# Altium PCB HP-85_IO_Extender_V2_4_Layer.PcbDoc
Units mil, origin at the board's own origin, x right, y up, seen from the top; angles counter-clockwise.
Board outline 4900 x 3937.01 mil, 4 copper layers (Top Layer, VCC, GND, Bottom Layer), stack 60.417 mil thick; 45 components, 37 nets, 161 pads, 87 vias.
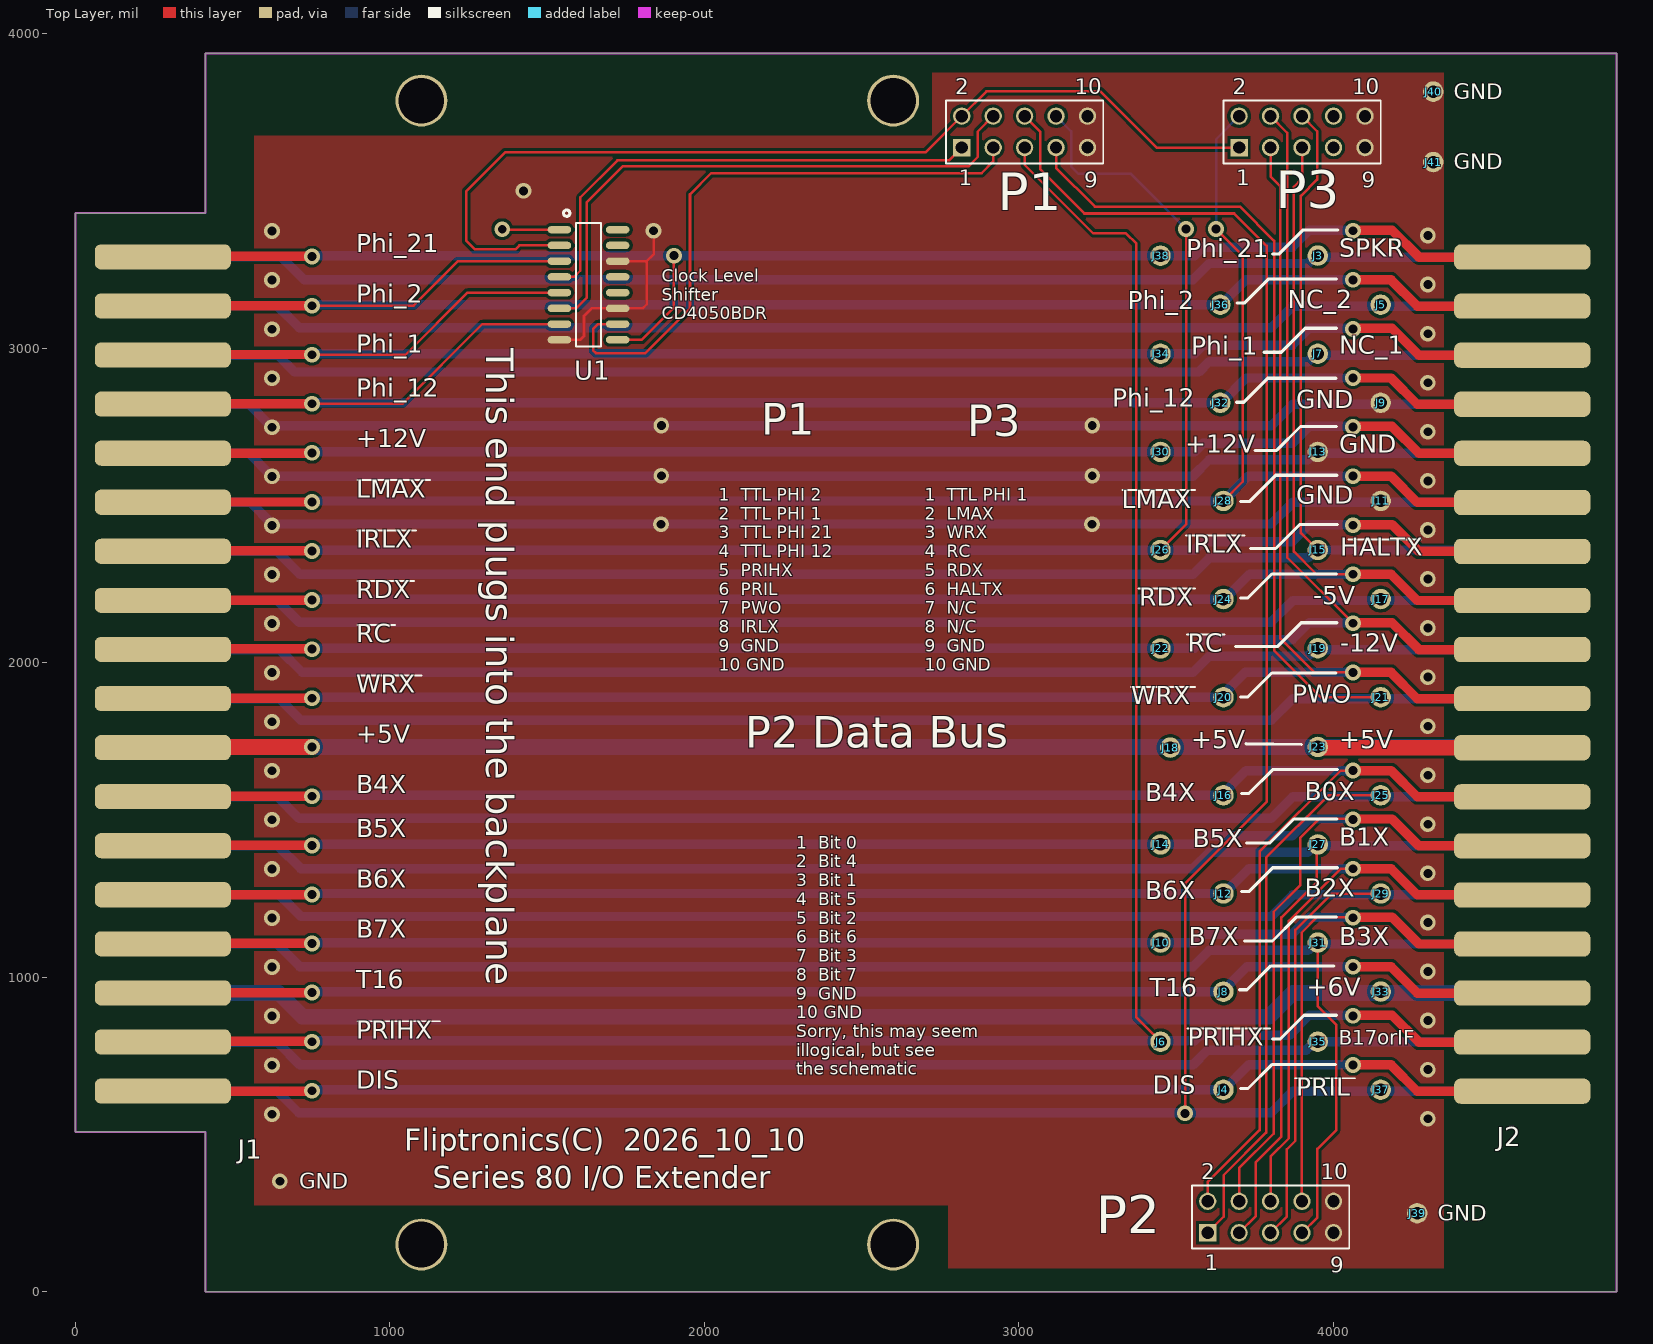
[diagram p0: Top Layer view]
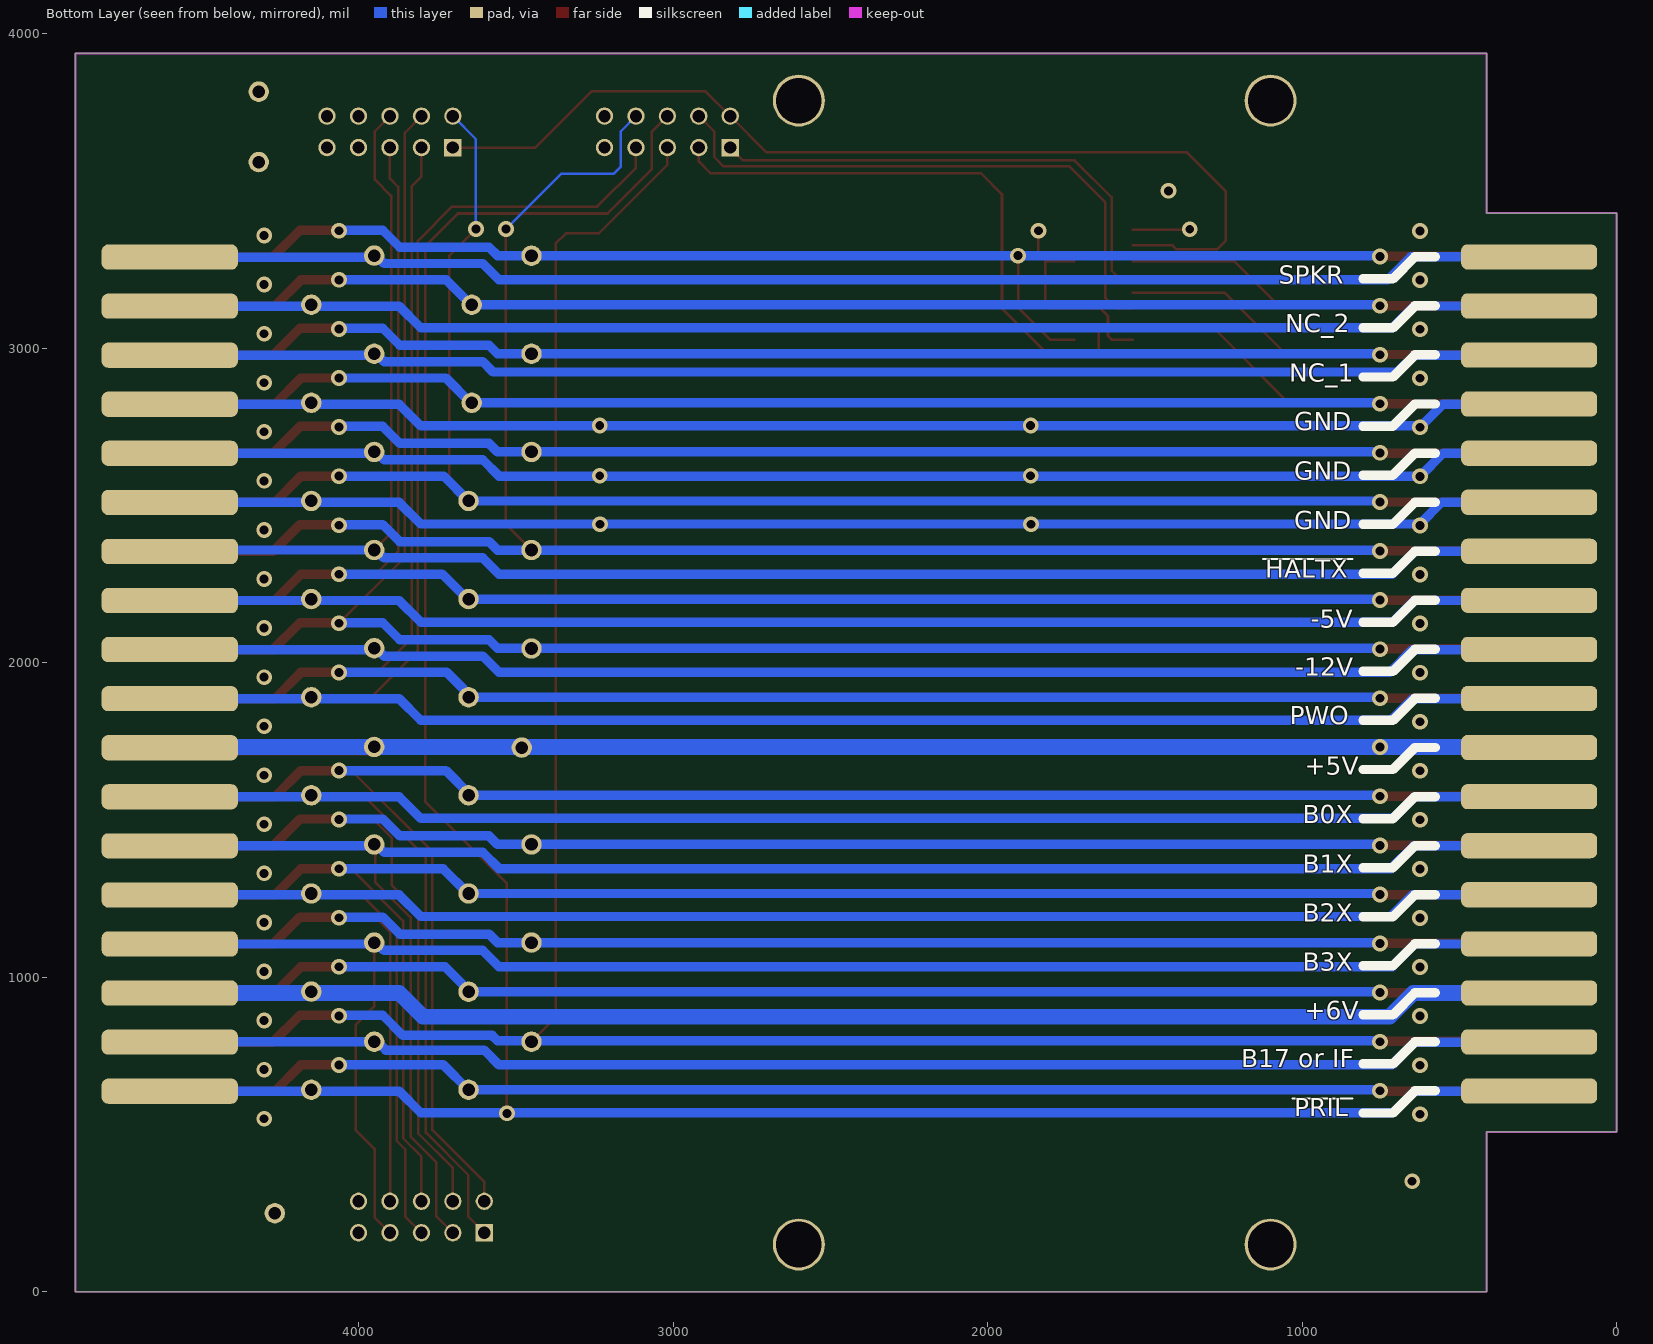
[diagram p1: Bottom Layer view, seen from below]
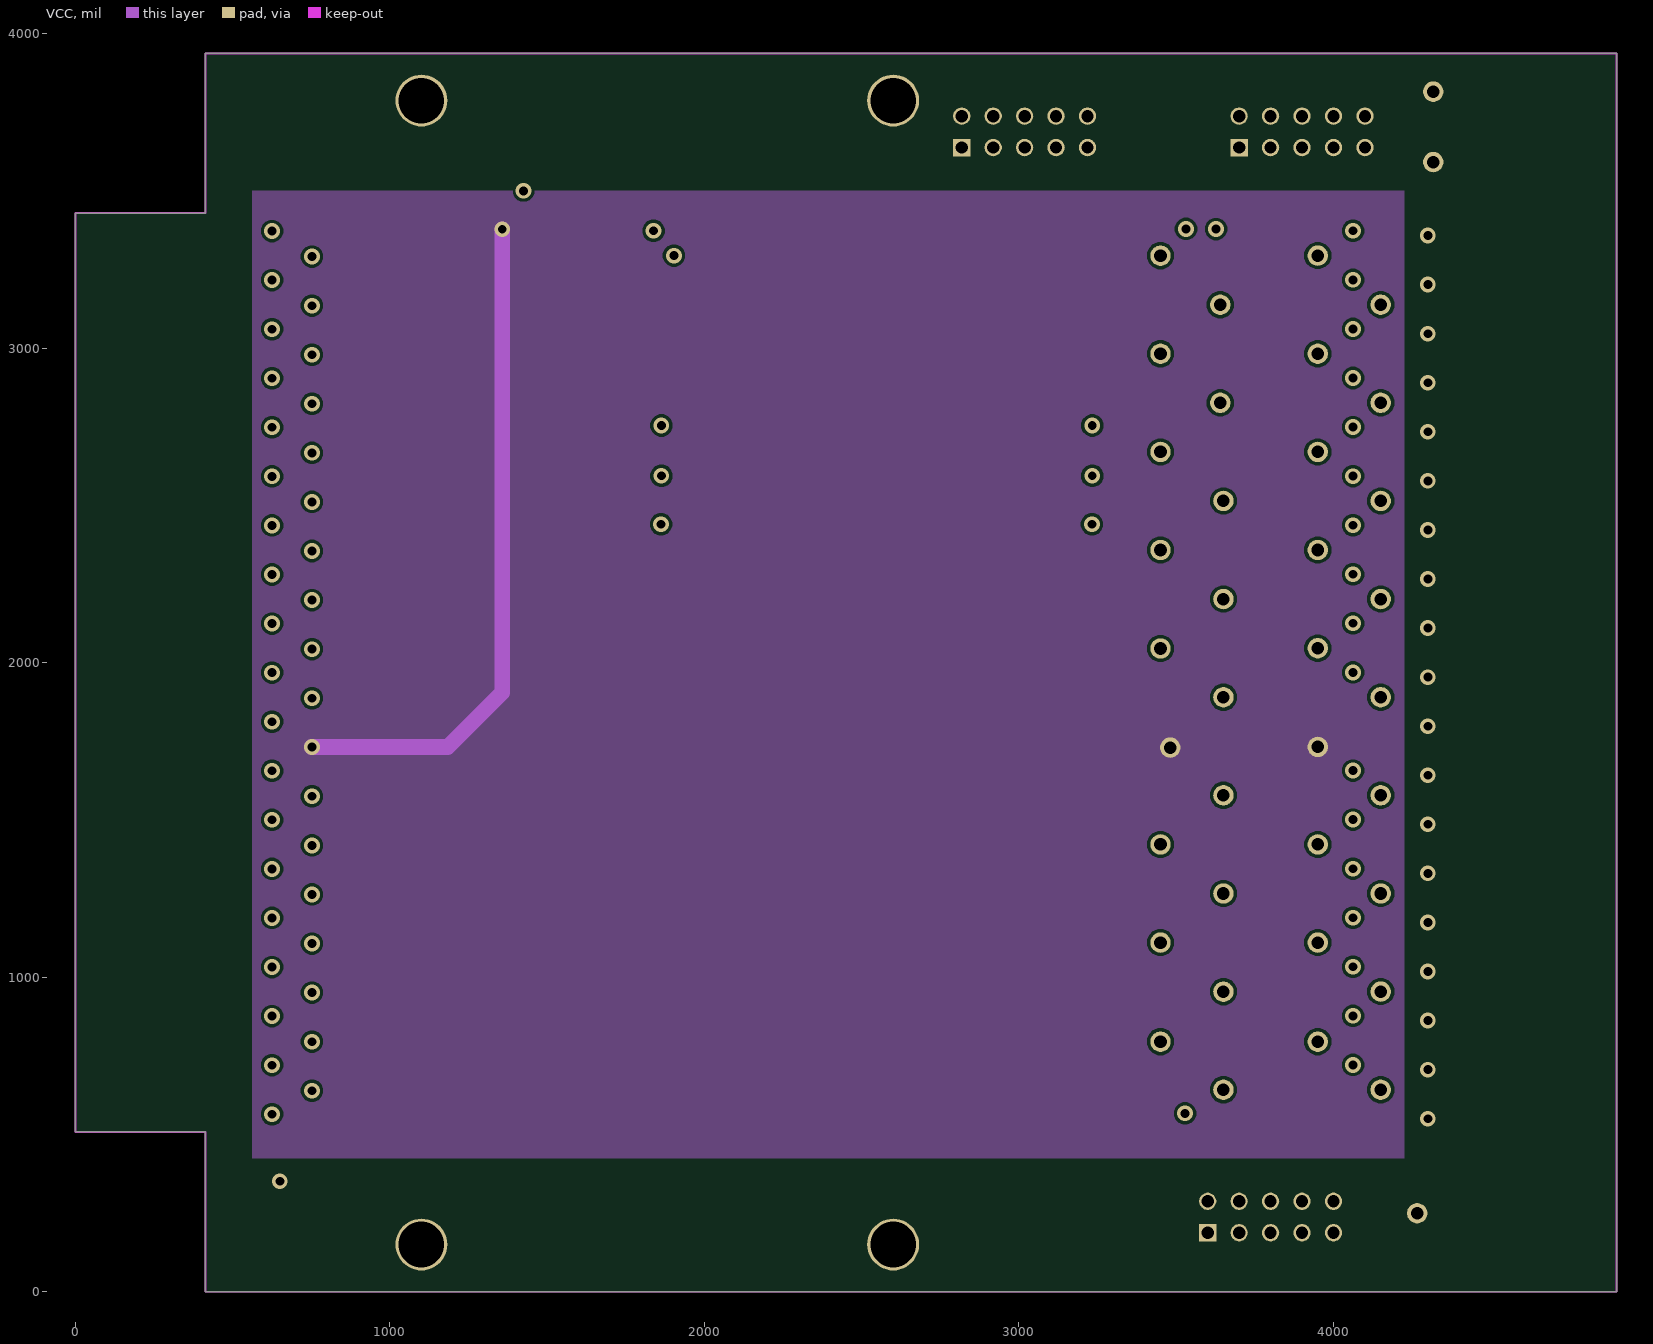
[diagram p2: VCC]
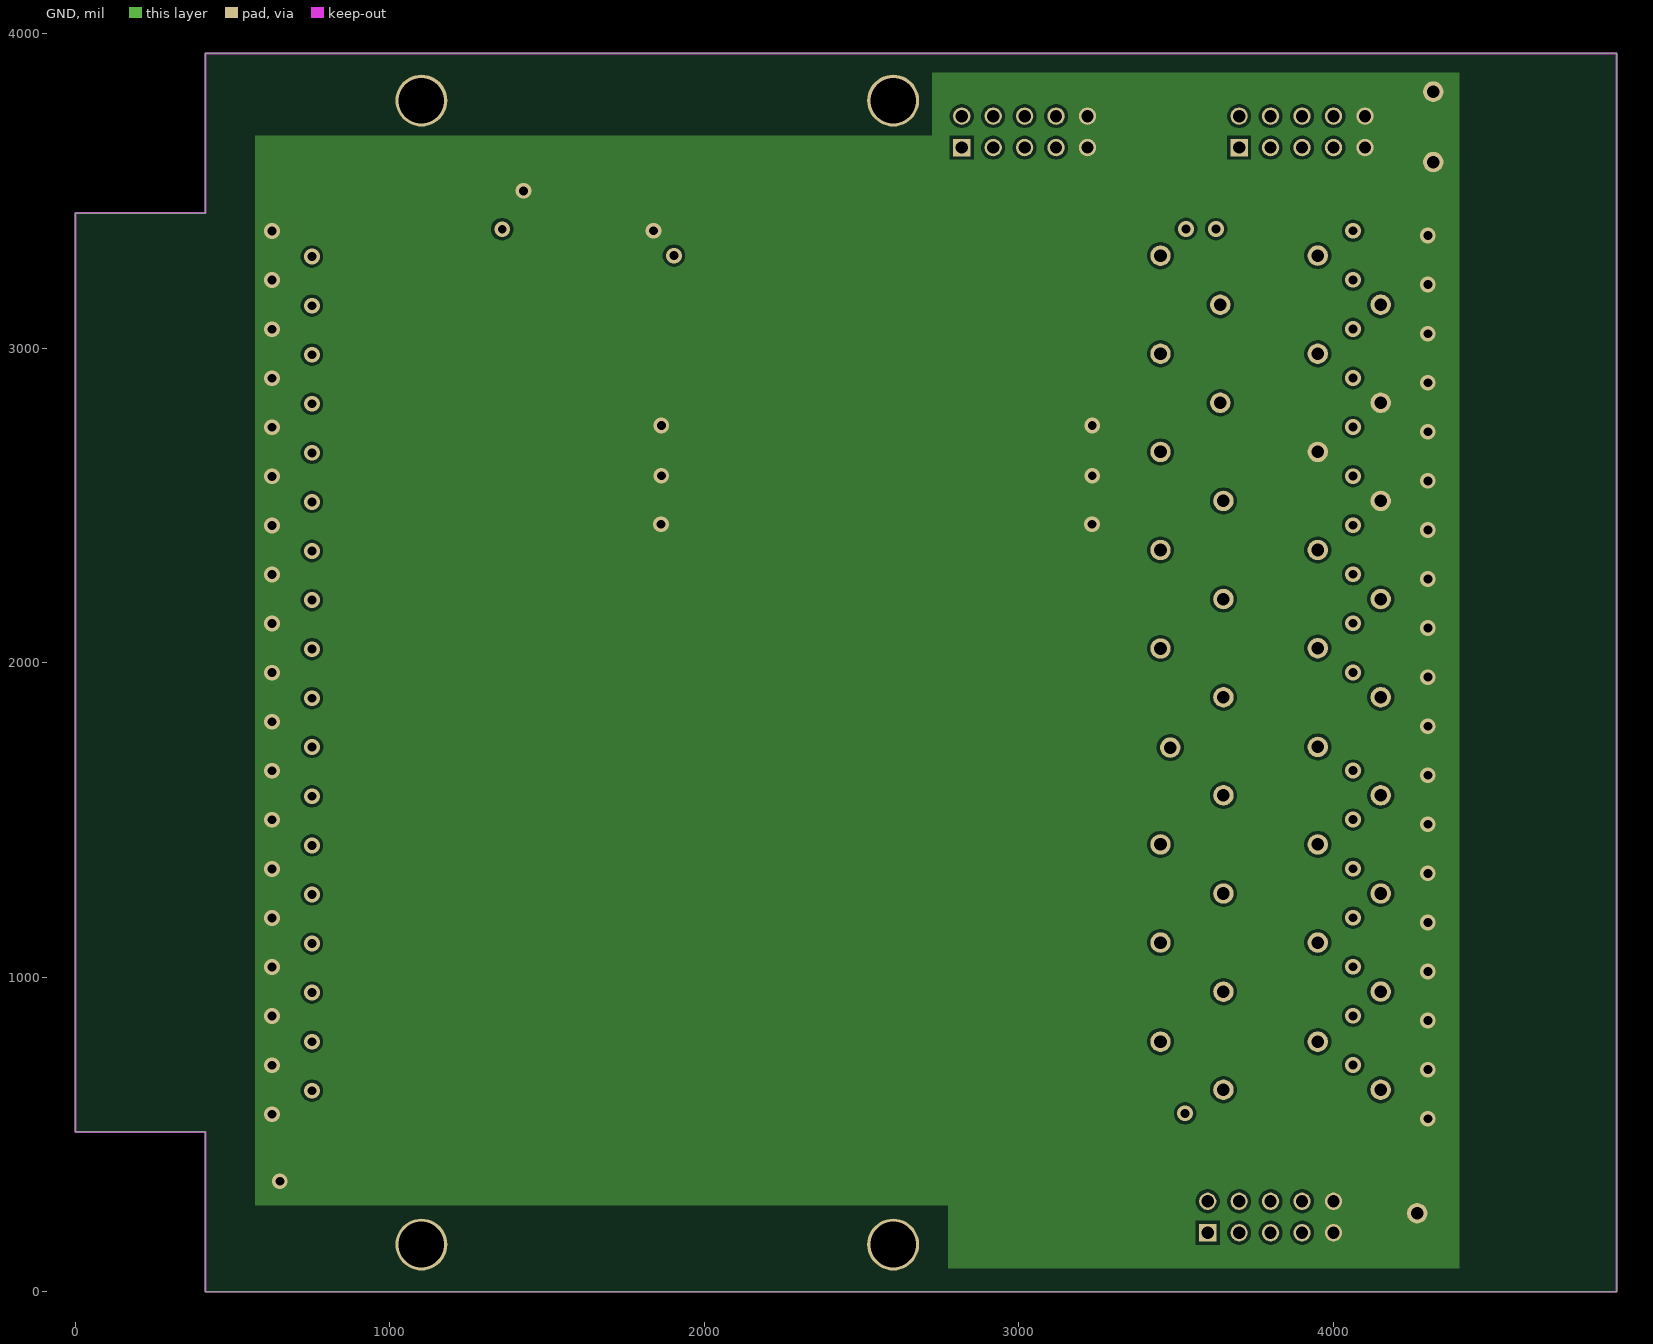
[diagram p3: GND]
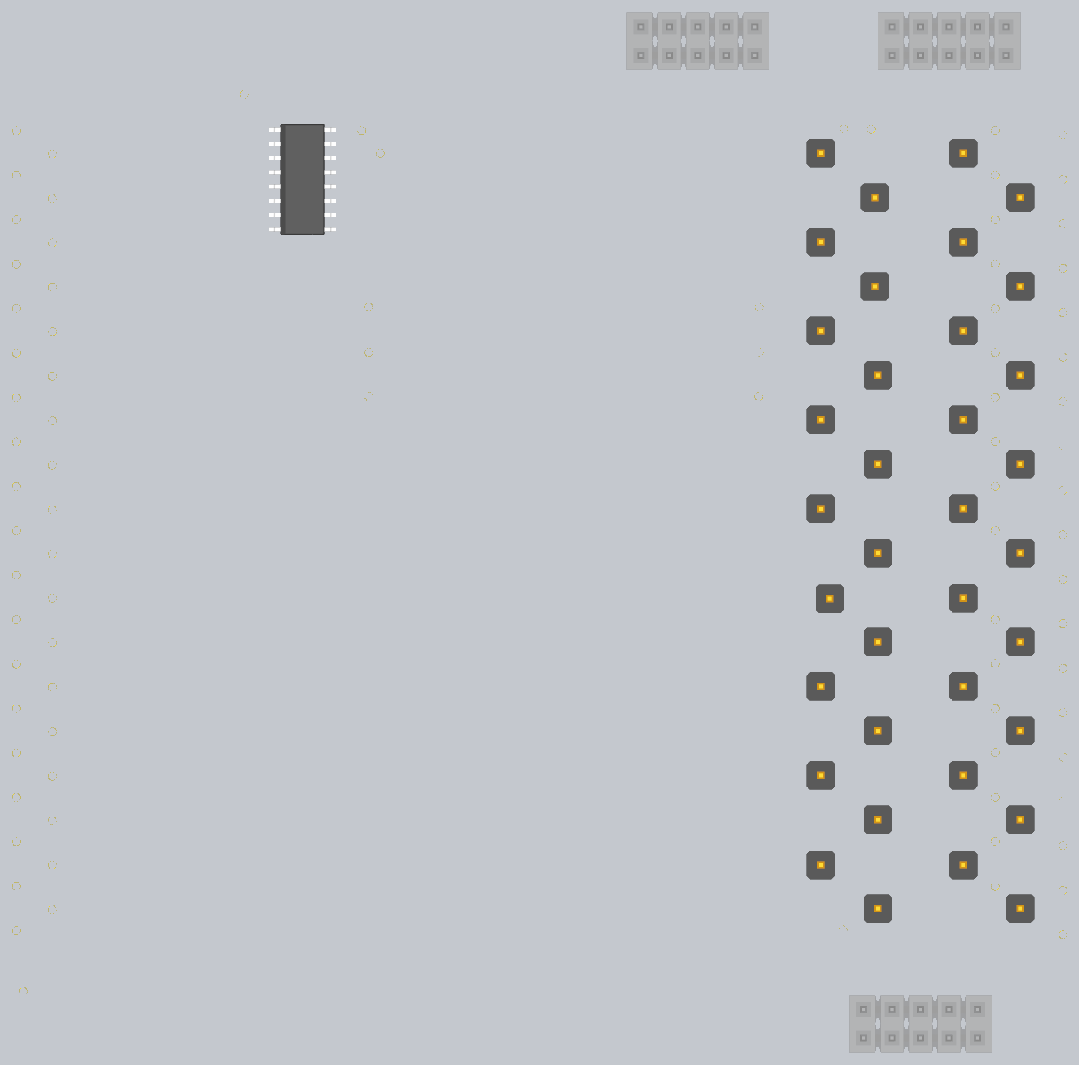
[diagram p4: 3D render of the assembled board from above, using the file's embedded part models]

## Layer stack, top to bottom
Top Solder: solder mask 0.4, Solder Resist, Dk 3.5
Top Layer: signal copper 1.4
Dielectric 2: prepreg 8.6, PP-023, Dk 4.5
VCC: signal copper 0.7087
Dielectric 1: core 39, Core-042, Dk 4.6
GND: signal copper 0.7087
Dielectric 3: prepreg 8.6, PP-023, Dk 4.5
Bottom Layer: signal copper 1.4
Bottom Solder: solder mask 0.4, Solder Resist, Dk 3.5

## Board outline
0,507.87 0,3429.13 413.39,3429.13 413.39,3937.01 4900,3937.01 4900,0 413.39,0 413.39,507.87

## Design rules (kind name [scope] priority, off if disabled: settings)
Clearance [All] p1: gap=10 ignorepadtopadclearanceinfootprint=FALSE except(0: Arc-Hole Track-Hole SMDPad-Hole THPad-Hole Via-Hole Fill-Hole Poly-Hole Region-Hole Text-Hole)
HoleSize [All] p1: absolutevalues=TRUE maxlimit=200 minlimit=1 maxpercent=80.000 minpercent=20.000
PolygonConnect [All] p1: connectstyle=Direct reliefconductorwidth=10 reliefentries=4 polygonreliefangle="90 Angle" airgapwidth=10
RoutingVias RoutingVias_1 [All] p1: holewidth=28 width=50 viastyle="Through Hole" minholewidth=28 minwidth=50 maxholewidth=28 maxwidth=50
SilkToSilkClearance [All] p1: silktosilkclearance=0
SilkToSolderMaskClearance [IsPad] p1: minsilkscreentomaskgap=5 clearancetoexposedcopper=FALSE
SolderMaskExpansion [All] p1: expansion=4 istentingtop=FALSE
Width Width_1 [All] p1: maxlimit=200 minlimit=6 preferedwidth=8
Width Width-BoardLayer [OnLayer('Board')] p2: maxlimit=39.37 minlimit=7.87 preferedwidth=7.87
27 further rules are at their usual default settings.

## Components (designator, comment, footprint, x,y, rotation, side; value= is the part's Value field where it differs from the comment)
J1 "Fingers for 36 pins 0.156\" pitch" "FINGERS FOR 36 PINS 0.156\" PITCH" 278,1964 r180 top
J2 "Fingers for 36 pins 0.156\" pitch" "FINGERS FOR 36 PINS 0.156\" PITCH" 4600,1963.5 r180 top
J3 "HDR 1X1" HDR_1X1_2MM54_ROUND#1 3950,3294.18 r0 top
J4 "HDR 1X1" HDR_1X1_2MM54_ROUND#1 3650,642 r0 top
J5 "HDR 1X1" HDR_1X1_2MM54_ROUND#1 4150,3138.18 r0 top
J6 "HDR 1X1" HDR_1X1_2MM54_ROUND#1 3450,795 r0 top
J7 "HDR 1X1" HDR_1X1_2MM54_ROUND#1 3950,2982 r0 top
J8 "HDR 1X1" HDR_1X1_2MM54_ROUND#1 3650,954 r0 top
J9 "HDR 1X1" HDR_1X1_2MM54_ROUND#1 4150,2826.18 r0 top
J10 "HDR 1X1" HDR_1X1_2MM54_ROUND#1 3450,1110 r0 top
J11 "HDR 1X1" HDR_1X1_2MM54_ROUND#1 4150,2514.18 r0 top
J12 "HDR 1X1" HDR_1X1_2MM54_ROUND#1 3650,1266 r0 top
J13 "HDR 1X1" HDR_1X1_2MM54_ROUND#1 3950,2670 r0 top
J14 "HDR 1X1" HDR_1X1_2MM54_ROUND#1 3450,1422 r0 top
J15 "HDR 1X1" HDR_1X1_2MM54_ROUND#1 3950,2358.18 r0 top
J16 "HDR 1X1" HDR_1X1_2MM54_ROUND#1 3650,1578.18 r0 top
J17 "HDR 1X1" HDR_1X1_2MM54_ROUND#1 4150,2202.18 r0 top
J18 "HDR 1X1" HDR_1X1_2MM54_ROUND#1 3481,1730 r0 top
J19 "HDR 1X1" HDR_1X1_2MM54_ROUND#1 3950,2046 r0 top
J20 "HDR 1X1" HDR_1X1_2MM54_ROUND#1 3650,1890 r90 top
J21 "HDR 1X1" HDR_1X1_2MM54_ROUND#1 4150,1890.18 r0 top
J22 "HDR 1X1" HDR_1X1_2MM54_ROUND#1 3450,2045 r90 top
J23 "HDR 1X1" HDR_1X1_2MM54_ROUND#2 3950,1732 r90 top locked
J24 "HDR 1X1" HDR_1X1_2MM54_ROUND#1 3650,2202.18 r90 top
J25 "HDR 1X1" HDR_1X1_2MM54_ROUND#1 4150,1578.18 r90 top
J26 "HDR 1X1" HDR_1X1_2MM54_ROUND#1 3450,2358.18 r90 top
J27 "HDR 1X1" HDR_1X1_2MM54_ROUND#1 3950.18,1422 r90 top
J28 "HDR 1X1" HDR_1X1_2MM54_ROUND#1 3650,2514.18 r90 top
J29 "HDR 1X1" HDR_1X1_2MM54_ROUND#1 4150,1266 r90 top
J30 "HDR 1X1" HDR_1X1_2MM54_ROUND#1 3450,2670 r90 top
J31 "HDR 1X1" HDR_1X1_2MM54_ROUND#1 3950,1110 r0 top
J32 "HDR 1X1" HDR_1X1_2MM54_ROUND#1 3640,2826 r90 top
J33 "HDR 1X1" HDR_1X1_2MM54_ROUND#1 4150,954.18 r90 top
J34 "HDR 1X1" HDR_1X1_2MM54_ROUND#1 3450,2982 r90 top
J35 "HDR 1X1" HDR_1X1_2MM54_ROUND#1 3950,795 r90 top
J36 "HDR 1X1" HDR_1X1_2MM54_ROUND#1 3640,3138 r90 top
J37 "HDR 1X1" HDR_1X1_2MM54_ROUND#1 4150,642 r90 top
J38 "HDR 1X1" HDR_1X1_2MM54_ROUND#1 3450,3294 r90 top
J39 "HDR 1X1" HDR_1X1_2MM54_round 4266,249.5 r90 top
J40 "HDR 1X1" HDR_1X1_2MM54_round 4317,3815.5 r90 top
J41 "HDR 1X1" HDR_1X1_2MM54_round 4317,3591.5 r0 top
P1 "Header 5X2" "HDR_5X2 alt 1" 2818,3637.5 r0 top
P2 "Header 5X2" "HDR_5X2 alt 1" 3600,187.5 r0 top
P3 "Header 5X2" "HDR_5X2 alt 1" 3700,3637.5 r0 top
U1 "CD4050BDR" "SOIC 16 W3.9mm P1.27mm" 1631.52,3201.5 r0 top

## Footprints (in the part's own frame and the unit in brackets; to place one, negate y for a bottom-side part, rotate by r counter-clockwise, add the part's x,y. Pads: shape width x height; smd on the part's side, far side on the other; paste and mask are expansions set on the pad)
"FINGERS FOR 36 PINS 0.156\" PITCH" [mil] "PCB fingers to match 36 pin edge connector with 2x18 at 0.156\" pitch"
  rrect50% 433x80 smd far side paste-50 mask+40: B1(0,-1326) B2(0,-1170) B3(0,-1014) B4(0,-858) B5(0,-702) B6(0,-546) B7(0,-390) B8(0,-234) B9(0,-78) B10(0,78) B11(0,234) B12(0,390) B13(0,546) B14(0,702) B15(0,858) B16(0,1014) B17(0,1170) B18(0,1326)
  rrect50% 433x80 smd paste-50 mask+40: T1(0,-1326) T2(0,-1170) T3(0,-1014) T4(0,-858) T5(0,-702) T6(0,-546) T7(0,-390) T8(0,-234) T9(0,-78) T10(0,78) T11(0,234) T12(0,390) T13(0,546) T14(0,702) T15(0,858) T16(0,1014) T17(0,1170) T18(0,1326)
HDR_1X1_2MM54_ROUND#1 [mil] "HDR_1X1_2MM54_02_11?2011"
  round 65 hole 40: 1(0,0)
  body extent -50,-50 50,50, height 398
HDR_1X1_2MM54_ROUND#2 [mil] "HDR_1X1_2MM54_02_11?2011"
  round 65 hole 40: 1(0,-0.18)
  body extent -50,-50 50,50, height 398
HDR_1X1_2MM54_round [mil] "HDR_1X1_2MM54_02_11?2011"
  round 65 hole 40: 1(0,0)
"HDR_5X2 alt 1" [mil] "HDR_5X2_2MM54_2010/02/23"
  rect 55x55 hole 39: 1(0,0)
  round 55 hole 39: 2(0,100) 3(100,0) 4(100,100) 5(200,0) 6(200,100) 7(300,0) 8(300,100) 9(400,0) 10(400,100)
  silkscreen extent -50,-50 450,150, body extent -50,-50 450,150, height 330
"SOIC 16 W3.9mm P1.27mm" [mm] "SOIC, 16-Leads, Body 9.9x3.9mm, Pitch 1.27mm, IPC High Density"
  oval 1.9x0.6 smd: 1(-2.35,4.445) 2(-2.35,3.175) 3(-2.35,1.905) 4(-2.35,0.635) 5(-2.35,-0.635) 6(-2.35,-1.905) 7(-2.35,-3.175) 8(-2.35,-4.445) 9(2.35,-4.445) 10(2.35,-3.175) 11(2.35,-1.905) 12(2.35,-0.635) 13(2.35,0.635) 14(2.35,1.905) 15(2.35,3.175) 16(2.35,4.445)
  silkscreen extent -2.02,-5 1,6.03, body extent -3.02,-4.95 2.97,4.95, height 1.59

## Part data
J1 J2: library part "J Fingers for 36 pins 0.156\" pitch for HP85", "Fingers for 36 pins 0.156\" pitch for HP85"
J3 J4 J5 J6 J7 J8 J9 J10 J11 J12 J13 J14 J15 J16 J17 J18 J19 J20 J21 J22 J23 J24 J25 J26 J27 J28 J29 J30 J31 J32 J33 J34 J35 J36 J37 J38 J39 J40 J41: library part "J Header 1X1", "Header, 1-Pin", 1 MANUFACTURE A=Fliptronics, 1 MANUFACTURE A PART NUMBER="Header 1X1", 1 MANUFACTURE A WEBSITE=~, 1 DISTRIBUTOR A=Fliptronics, 1 DISTRIBUTOR A ordering number="Philips Parts bin", 1 DISTRIBUTOR A price 1 off=0.01, 1 DISTRIBUTOR A price 100 off=0.01, LatestRevisionDate=2/11/2011, LatestRevisionNote="Created by PMF", Publisher=Fliptronics, Supplier 1=Fliptronics, Supplier Part Number 1="Header 1X1", Supplier Stock 1=20, Supplier Unit Price 1=0.01
P1 P2 P3: library part "J Header 5X2", "Header, 5-Pin, Dual row", 1 MANUFACTURE A WEBSITE=~, Supplier Part Number 1=3M9460-ND, 1 DISTRIBUTOR A=Digi-Key, 1 DISTRIBUTOR A ordering number=3M9460-ND, 1 DISTRIBUTOR A price 1 off=0.46, 1 DISTRIBUTOR A price 100 off=0.336, LatestRevisionDate=17-Jul-2002, LatestRevisionNote="Re-released for DXP Platform.", Publisher="Altium Limited", Supplier 1=Digi-Key
U1: library part "U CD4050BDR", "48mA 1 3V~18V 8mA 6 SOP-16 Buffer/Driver/Transceiver ROHS", Case/Package=SOIC, High Level Output Current=-5.2mA, Low Level Output Current=8mA, Manufacturer="Texas Instruments", Manufacturer Lifecycle Status=ACTIVE, Max Operating Temperature=125°C, Max Supply Voltage=20V, Min Operating Temperature=-55°C, Min Supply Voltage=-500mV, Quiescent Current=20µA, Supplier Part Number 1=296-31503-1-ND, Category="Buffers, Drivers and Transceivers", ComponentLink1Description=https://datasheet.octopart.com:443/CD4050BDR-Texas-Instruments-datasheet-27203525.pdf?src-supplier=Texas+Instruments, ComponentLink1URL=https://datasheet.octopart.com:443/CD4050BDR-Texas-Instruments-datasheet-27203525.pdf?src-supplier=Texas+Instruments, ComponentLink2Description=https://octopart.com:443/opatz8j6/c1?t=shVpaK6kaZhAvTquMlP1kBmJufYCgjIb7Ueuvqz-PnQIGf9tBCA2wmVZVeSwyNL0wzyf1zJ6cCOTEOJQq0X9BE7WZFlE6C07Lu1yrPRH_7pU960K83zF6yinbbCHbFuD_5RPOvEgQG4NC-UyO4eI_-JLm9EqoVbgrPpU-OW4hF6S15oXQIfFl2K9w9uWlKjIYejht7RtKTQToVbOn7eFDvn1ewvRfpT4TuhUbb8n15bolN7mi033KwD5LlF8ls95dB4PEoMTxflP_fiLEga3HBAg6_F-FWLajFotRU9aIDiCdH1EM8mIYNgu9aan6gZA_nC7nOERzDGX5uTal7J7VcnLExSN8lvBAblD4E7X5ipqS6VayOPvGHdeXsXJXIgW7ksw&src-supplier=Texas+Instruments, ComponentLink2URL=https://octopart.com:443/opatz8j6/c1?t=shVpaK6kaZhAvTquMlP1kBmJufYCgjIb7Ueuvqz-PnQIGf9tBCA2wmVZVeSwyNL0wzyf1zJ6cCOTEOJQq0X9BE7WZFlE6C07Lu1yrPRH_7pU960K83zF6yinbbCHbFuD_5RPOvEgQG4NC-UyO4eI_-JLm9EqoVbgrPpU-OW4hF6S15oXQIfFl2K9w9uWlKjIYejht7RtKTQToVbOn7eFDvn1ewvRfpT4TuhUbb8n15bolN7mi033KwD5LlF8ls95dB4PEoMTxflP_fiLEga3HBAg6_F-FWLajFotRU9aIDiCdH1EM8mIYNgu9aan6gZA_nC7nOERzDGX5uTal7J7VcnLExSN8lvBAblD4E7X5ipqS6VayOPvGHdeXsXJXIgW7ksw&src-supplier=Texas+Instruments, ComponentLink3Description=https://datasheet.octopart.com:443/CD4050BDR-Texas-Instruments-datasheet-10770490.pdf?src-supplier=Texas+Instruments, ComponentLink3URL=https://datasheet.octopart.com:443/CD4050BDR-Texas-Instruments-datasheet-10770490.pdf?src-supplier=Texas+Instruments, ComponentLink4Description=https://datasheet.octopart.com:443/CD4050BDR-Texas-Instruments-datasheet-10254678.pdf?src-supplier=Texas+Instruments, ComponentLink4URL=https://datasheet.octopart.com:443/CD4050BDR-Texas-Instruments-datasheet-10254678.pdf?src-supplier=Texas+Instruments, ComponentLink5Description=https://sigma.octopart.com:443/49249801/technical_drawing/Texas-Instruments-CD4050BDR.pdf?src-supplier=Texas+Instruments, ComponentLink5URL=https://sigma.octopart.com:443/49249801/technical_drawing/Texas-Instruments-CD4050BDR.pdf?src-supplier=Texas+Instruments, ComponentLink6Description=https://datasheet.octopart.com:443/CD4050BDR-Texas-Instruments-datasheet-148518.pdf?src-supplier=Texas+Instruments, ComponentLink6URL=https://datasheet.octopart.com:443/CD4050BDR-Texas-Instruments-datasheet-148518.pdf?src-supplier=Texas+Instruments, ComponentLink7Description=https://datasheet.octopart.com:443/CD4050BDR-Texas-Instruments-datasheet-10253518.pdf?src-supplier=Texas+Instruments, ComponentLink7URL=https://datasheet.octopart.com:443/CD4050BDR-Texas-Instruments-datasheet-10253518.pdf?src-supplier=Texas+Instruments, ComponentLink8Description=https://datasheet.octopart.com:443/CD4050BDR-Texas-Instruments-datasheet-47642703.pdf?src-supplier=Newark, ComponentLink8URL=https://datasheet.octopart.com:443/CD4050BDR-Texas-Instruments-datasheet-47642703.pdf?src-supplier=Newark, ComponentLink9Description=https://datasheet.octopart.com:443/CD4050BDR-Texas-Instruments-datasheet-21412919.pdf?src-supplier=Newark, ComponentLink9URL=https://datasheet.octopart.com:443/CD4050BDR-Texas-Instruments-datasheet-21412919.pdf?src-supplier=Newark, ComponentLink10Description=https://datasheet.octopart.com:443/CD4050BDR-Texas-Instruments-datasheet-11534345.pdf?src-supplier=Newark, ComponentLink10URL=https://datasheet.octopart.com:443/CD4050BDR-Texas-Instruments-datasheet-11534345.pdf?src-supplier=Newark, ComponentLink11Description=https://datasheet.octopart.com:443/CD4050BDR-Texas-Instruments-datasheet-164413289.pdf?src-supplier=SHENGYU+ELECTRONICS, ComponentLink11URL=https://datasheet.octopart.com:443/CD4050BDR-Texas-Instruments-datasheet-164413289.pdf?src-supplier=SHENGYU+ELECTRONICS, ComponentLink12Description=https://datasheet.octopart.com:443/CD4050BDR-Texas-Instruments-datasheet-159114768.pdf?src-supplier=LCSC, ComponentLink12URL=https://datasheet.octopart.com:443/CD4050BDR-Texas-Instruments-datasheet-159114768.pdf?src-supplier=LCSC, ComponentLink13Description=https://datasheet.octopart.com:443/CD4050BDR-Texas-Instruments-datasheet-14144724.pdf?src-supplier=iiiC, ComponentLink13URL=https://datasheet.octopart.com:443/CD4050BDR-Texas-Instruments-datasheet-14144724.pdf?src-supplier=iiiC, ComponentLink14Description=http://sigma.octopart.com:80/reach_statement/Texas-Instruments-company-64.pdf?src-supplier=Compliance+Statements, ComponentLink14URL=http://sigma.octopart.com:80/reach_statement/Texas-Instruments-company-64.pdf?src-supplier=Compliance+Statements, ComponentLink15Description=http://sigma.octopart.com:80/conflict_mineral_statement/Texas-Instruments-company-63.pdf?src-supplier=Compliance+Statements, ComponentLink15URL=http://sigma.octopart.com:80/conflict_mineral_statement/Texas-Instruments-company-63.pdf?src-supplier=Compliance+Statements, Contact Plating=Gold, Height=1.75mm, Lead Free="Lead Free", Length=9.9mm, Lifecycle Status=Production, Logic Function=Buffer, Manufacturer Part Number=CD4050BDR, Mount="Surface Mount", Number of Bits=6, Number of Bits per Element=1, Number of Channels=6, Number of Elements=6, Number of Input Lines=6, Number of Inputs=6, Number of Output Lines=6, Number of Outputs=6, Number of Pins=16, Polarity=Non-Inverting, Pricing 1="1=0.65, 10=0.463, 25=0.4148, 100=0.3619, 250=0.33672, 500=0.32152, 1000=0.31463 (USD)", Propagation Delay=60ns, REACH SVHC=No, RoHS=Compliant, Schedule B="8542390000, 8542390000|8542390000, 8542390000|8542390000|8542390000, 8542390000|8542390000|8542390000|8542390000", Stock 1=14885, Supplier 1=DigiKey, Thickness=1.58mm, Turn-On Delay Time=140ns, Width=3.91mm

## Free pads (board coordinates)
  round 165 hole 145: 0(1100,150) 0(1100,3787) 0(2600,150) 0(2600,3787)

## Via types
v1: diameter 50/50/50/50 (per signal layer), hole 28, Top Layer to Bottom Layer, 49 vias
v2: diameter 50, hole 28, Top Layer to Bottom Layer, 38 vias

## Nets (pads, with @x,y where several pads share a name; then routed paths per layer and width w, separated by ;. In a path a pad name is that pad's centre, name@x,y a point inside that pad or via, vN(x,y) a via of type N, cw(c..) or ccw(c..) an arc to the next point about the centre after c; other vN are vias at no path point)
+5V: J1.B11 J1.T11 J2.B11 J2.T11 J18.1 J23.1 U1.1 | length 7863.6
  Top Layer w8: v1(1357,3378) 1358.5,3376.5 U1.1
  Top Layer w30: J1.T11@237.22,1729.5 J1.T11@239.47,1731.75
  Top Layer w50: J1.T11@239.47,1731.75 v1@752.25,1731.75 ; J23.1@3950,1734 3952.87,1731.13 3963.48,1731.13 3965.1,1729.5 J2.T11
  VCC w50: v1(752.25,1732) 1184,1732 1357,1905 v1(1357,3378)
  Bottom Layer w50: J1.B11@237.22,1729.5 239.47,1731.75 v1@752.25,1731.75 ; v1(752.25,1732) J2.B11@4600,1732
+6V: J1.B16 J2.B16 J33.1 | length 4422.5
  Bottom Layer w50: J1.B16@237.22,949.5 644,949.5 ; 646.74,949.75 722.25,874.25 ; 722.25,874 3795.18,874 3870.81,949.63 J2.B16@4599.88,949.63
+12V: J1.T5 J2.T5 J30.1 | length 4391
  Top Layer w30: J1.T5 v2@752,2666 ; v2@4058,2751 4186,2751 4271.5,2665.5 J2.T5
  Bottom Layer w30: v2@752,2670 J30.1 3558,2670 3585,2697 3869,2697 3923,2751 v2@4058,2751
  other v2: 752,2667 4062,2749
-5V: J1.B8 J2.B8 J17.1 | length 4419.6
  Bottom Layer w30: J1.B8@237.22,2197.5 642.5,2197.5 711.18,2128.82 3802,2128.82 3870.81,2197.63 4150,2197.63 J2.B8@4599.88,2197.63
-12V: J1.B9 J2.B9 J19.1 | length 4423.3
  Bottom Layer w30: J1.B9@237.22,2041.5 648.74,2041.5 ; 648.74,2041.75 721,1969.5 ; 721,1969.25 3553.25,1969.25 3605,2021 3918.53,2021 3940.53,2043 J19.1@3950,2043 ; J19.1@3950,2041.5 J2.B9
\HALTX: J1.B7 J2.B7 J15.1 P3.6 | length 5827.7
  Top Layer w8: P3.6 3948,3689.5 3948,3536 3896,3484 3896,2412.18 J15.1
  Bottom Layer w30: J1.B7 641,2354 713.75,2281.25 3553.25,2281.25 3605,2333 3918.53,2333 3940.53,2355 J15.1@3950,2355 ; J15.1 4595.32,2358.18 J2.B7
\IRLX: J1.T7 J2.T7 J26.1 P1.8 | length 6115.3
  Top Layer w8: J26.1 3532,2440.18 3532,3378 v2(3531,3379)
  Top Layer w30: J1.T7@237.22,2353.5 239.47,2355.75 v2@752,2355.75 ; v2@4058,2439 4186,2439 4271.5,2353.5 J2.T7
  Bottom Layer w8: P1.8 3166,3689.5 3166,3577 3188,3555 3355,3555 v2(3531,3379)
  Bottom Layer w30: v2@752,2358 3450,2358 3558,2358 3585,2385 3869,2385 3923,2439 v2@4058,2439
  other v2: 752,2355 4062,2437
\LMAX: J1.T6 J2.T6 J28.1 P3.2 | length 5744.5
  Top Layer w8: v2(3626.5,3378.5) 3711,3294 3711,2575.18 J28.1
  Top Layer w30: J1.T6@237.22,2509.5 238.47,2510.75 v2@752,2510.75 ; v2(4062,2593) 4183,2593 4266.5,2509.5 J2.T6
  Bottom Layer w8: v2(3626.5,3378.5) 3626.5,3664 P3.2
  Bottom Layer w30: v2@753.25,2512.25 v2@755,2514 ; v2@755.25,2514.25 v2@755,2514 ; v2(4062,2593) 3728.82,2593 J28.1 3649.82,2514 v2@755,2514
  other v2: 752,2511
\PRIHX: J1.T17 J2.T17 J6.1 P1.5 | length 7515
  Top Layer w8: P1.5 3018,3583 3236,3365 3340,3365 3373,3332 3373,872 J6.1
  Top Layer w30: J1.T17@237.22,793.5 239.47,795.75 v2@752,795.75 ; v2@4058,879 4186,879 4271.5,793.5 J2.T17
  Bottom Layer w30: v2@752,798 3450,798 3558,798 3575,815 3859,815 3923,879 v2@4058,879
  other v2: 752,795 4062,877
\PRIL: J1.B18 J2.B18 J37.1 P1.6 | length 8294.8
  Top Layer w8: P1.6 3067,3688.5 3067,3569 3208,3428 3684,3428 3787,3325 3787,1557 3528,1298 v2(3528,567)
  Bottom Layer w30: J1.B18@237.22,637.5 641.5,637.5 710.18,568.82 3528,568.82 3802,568.82 3870.81,637.63 J2.B18@4599.88,637.63
\RC: J1.T9 J2.T9 J22.1 P3.4 | length 6150.7
  Top Layer w8: P3.4 3853,3684.5 3853,2334 4060,2127 v2(4062,2125)
  Top Layer w30: J1.T9@237.22,2041.5 239.47,2043.75 v2@752,2043.75 ; v2@4060,2127 4186,2127 4271.5,2041.5 J2.T9
  Bottom Layer w30: v2@753,2046 3450,2046 3558,2046 3585,2073 3869,2073 3923,2127 v2@4058,2127
  other v2: 752,2043
\RDX: J1.T8 J2.T8 J24.1 P3.5 | length 5943.5
  Top Layer w8: P3.5 3900,3539 3874,3513 3874,2353 3946,2281 v2(4062,2281)
  Top Layer w30: J1.T8@237.22,2197.5 238.47,2198.75 v2@752,2198.75 ; v2(4062,2281) 4183,2281 4266.5,2197.5 J2.T8
  Bottom Layer w30: v2@753.25,2200.25 v2@755,2202 ; v2@755.25,2202.25 v2@755,2202 ; v2(4062,2281) 3733,2281 3654,2202 v2@755,2202
  other v2: 752,2199
\WRX: J1.T10 J2.T10 J20.1 P3.3 | length 6279.8
  Top Layer w8: P3.3 3800,3545 3831.39,3513.61 3831.39,2076.61 3939,1969 v2(4062,1969)
  Top Layer w30: J1.T10@237.22,1885.5 238.47,1886.75 v2@752,1886.75 ; v2(4062,1969) 4183,1969 4266.5,1885.5 J2.T10
  Bottom Layer w30: v2@753.25,1888.25 v2@755,1890 ; v2@755.25,1890.25 v2@755,1890 ; v2(4062,1969) 3719,1969 3667.5,1917.5 3667.5,1916.97 3640.53,1890 v2@755,1890
  other v2: 752,1887
B0X: J1.B12 J2.B12 J25.1 P2.1 | length 6135.2
  Top Layer w8: P2.1 3651,238.5 3651,371 3786,506 3786,1380 3984.18,1578.18 J25.1
  Bottom Layer w30: J1.B12@237.22,1573.5 642.5,1573.5 711.18,1504.82 3802,1504.82 3870.81,1573.63 4150,1573.63 J2.B12@4599.88,1573.63
B1X: J1.B13 J2.B13 J27.1 P2.3 | length 5761.4
  Top Layer w8: P2.3 3752,239.5 3752,411 3834,493 3834,1190 3947,1303 3947,1418.82 J27.1
  Bottom Layer w30: J1.B13@237.22,1417.5 644.5,1417.5 716.75,1345.25 3553.25,1345.25 3605,1397 3918.53,1397 3940.53,1419 J27.1@3950,1419 ; J27.1@3950,1417.5 J2.B13
B2X: J1.B14 J2.B14 J29.1 P2.5 | length 5733.9
  Top Layer w8: P2.5 3852,239.5 3852,453 3879,480 3879,1150 3995,1266 J29.1
  Bottom Layer w30: J1.B14@237.22,1261.5 648.5,1261.5 717.18,1192.82 3802,1192.82 3870.81,1261.63 4150,1261.63 J2.B14@4599.88,1261.63
B3X: J1.B15 J2.B15 J31.1 P2.7 | length 5415.3
  Top Layer w8: P2.7 3949,236.5 3949,454 4009,514 4009,848 3950,907 J31.1
  Bottom Layer w30: J1.B15@237.22,1105.5 641.5,1105.5 713.75,1033.25 3553.25,1033.25 3605,1085 3918.53,1085 3940.53,1107 J31.1@3950,1107 ; J31.1@3950,1105.5 J2.B15
B4X: J1.T12 J2.T12 J16.1 P2.2 | length 6014.1
  Top Layer w8: P2.2 3600,349 3765,514 3765,1399 4023,1657 v2(4062,1657)
  Top Layer w30: J1.T12@237.22,1573.5 238.47,1574.75 v2@752,1574.75 ; v2(4062,1657) 4183,1657 4266.5,1573.5 J2.T12
  Bottom Layer w30: v2@753.25,1576.25 v2@755,1578 ; v2@755.25,1578.25 v2@755,1578 ; v2(4062,1657) 3722,1657 3643,1578 v2@755,1578
  other v2: 752,1575
B5X: J1.T13 J2.T13 J14.1 P2.4 | length 5857.4
  Top Layer w8: P2.4 3700,393 3810,503 3810,1208 3895,1293 3895,1444 3954,1503 v2@4058,1503
  Top Layer w30: J1.T13@237.22,1417.5 239.47,1419.75 v2@752,1419.75 ; v2@4058,1503 4186,1503 4271.5,1417.5 J2.T13
  Bottom Layer w30: v2@752,1422 J14.1 3558,1422 3585,1449 3869,1449 3923,1503 v2@4058,1503
  other v2: 752,1419 4062,1501
B6X: J1.T14 J2.T14 J12.1 P2.6 | length 5618.7
  Top Layer w8: P2.6 3800,430 3858,488 3858,1179 4024,1345 v2(4062,1345)
  Top Layer w30: J1.T14@237.22,1261.5 238.47,1262.75 v2@752,1262.75 ; v2(4062,1345) 4183,1345 4266.5,1261.5 J2.T14
  Bottom Layer w30: v2@753.25,1264.25 v2@755,1266 ; v2@755.25,1266.25 v2@755,1266 ; v2(4062,1345) 3731,1345 3652,1266 v2@755,1266
  other v2: 752,1263
B7X: J1.T15 J2.T15 J10.1 P2.8 | length 5466.5
  Top Layer w8: P2.8@3899,287.5 3899,1142 3948,1191 v2@4058,1191
  Top Layer w30: J1.T15@237.22,1105.5 239.47,1107.75 v2@752,1107.75 ; v2@4058,1191 4186,1191 4271.5,1105.5 J2.T15
  Bottom Layer w30: v2@752,1110 J10.1 3558,1110 3585,1137 3869,1137 3923,1191 v2@4058,1191
  other v2: 752,1107 4062,1189
B17: J1.B17 J2.B17 J35.1 | length 4421.8
  Bottom Layer w30: J1.B17@237.22,793.5 641.5,793.5 713.75,721.25 3553.25,721.25 3600,768 3913.53,768 3940.53,795 J2.B17@4598.5,795
DIS: J1.T18 J2.T18 J4.1 | length 4388.3
  Top Layer w30: J1.T18 v2@751,638 ; v2(4062,721) 4183,721 4266.5,637.5 J2.T18
  Bottom Layer w30: v2@752,642 J4.1 3651,642 3730,721 v2(4062,721)
  other v2: 752,639
GND: J1.B4 J1.B5 J1.B6 J2.B4 J2.B5 J2.B6 J9.1 J11.1 J13.1 J39.1 J40.1 J41.1 P1.9 P1.10 P2.9 P2.10 P3.9 P3.10 U1.8 U1.11 U1.14 | length 13953.6
  Top Layer w8: U1.8 1604.5,3026.5 1617,3039 1617,3102 1641.5,3126.5 U1.11 1803.5,3126.5 1816.5,3139.5 1816.5,3276.5 ; U1.14 1816.5,3276.5 ; v1@1839,3372 v1(1838,3373) 1838,3298 1816.5,3276.5
  Bottom Layer w30: J1.B6@237.22,2509.5 556.56,2509.5 ; J1.B5@237.22,2665.5 551.74,2665.5 ; J1.B4@237.22,2821.5 551.99,2821.5 v1(625.25,2748.25) ; 551.74,2665.75 v1(625.25,2592.25) ; 556.56,2509.75 v1@625.25,2441.07 ; v1@625.25,2440.82 3802,2440.82 3870.81,2509.63 J2.B6@4599.88,2509.63 ; v1@625.25,2593.25 3553.25,2593.25 3605,2645 3918.53,2645 3940.53,2667 J13.1@3950,2667 ; v1@634,2752.82 2063,2752.82 3802,2752.82 3870.81,2821.63 J2.B4@4599.88,2821.63 ; J13.1@3950,2665.5 J2.B5
  other v1: 650,351 4300,550 625.25,564.25 4300,706 625.25,720.25 4300,862 625.25,876.25 4300,1018 625.25,1032.25 4300,1174 625.25,1188.25 4300,1330 625.25,1344.25 4300,1486 625.25,1500.25 4300,1642 625.25,1656.25 4300,1798 625.25,1812.25 4300,1954 625.25,1968.25 4300,2110 625.25,2124.25 4300,2266 625.25,2280.25 4300,2422 625.25,2436.25 1862,2440 3232,2440 4300,2578 1863,2594 3233,2594 4300,2734 1863,2754 3233,2754 4300,2890 625.25,2904.25 4300,3046 625.25,3060.25 4300,3202 625.25,3216.25 4300,3358 625.25,3372.25 1425,3500
NC_1: J1.B3 J2.B3 J7.1 | length 4407.7
  Bottom Layer w30: J1.B3@237.22,2977.5 643.5,2977.5 697,2924 3572,2924 3605,2957 3918.53,2957 3940.53,2979 J7.1@3950,2979 ; J7.1@3950,2977.5 J2.B3
NC_2: J1.B2 J2.B2 J5.1 | length 4379
  Bottom Layer w30: J1.B2 643,3134 712.18,3064.82 3802,3064.82 3870.81,3133.63 J2.B2@4599.88,3133.63
PHI_1: J1.T3 J2.T3 J34.1 U1.5 | length 5303.7
  Top Layer w8: v2(752,2979) 1049,2979 1246.5,3176.5 U1.5
  Top Layer w30: J1.T3@237.22,2977.5 239.47,2979.75 v2@754.25,2979.75 ; v2@4058,3063 4186,3063 4271.5,2977.5 J2.T3
  Bottom Layer w30: v2@752,2982 J34.1 3558,2982 3585,3009 3869,3009 3923,3063 v2@4058,3063
  other v2: 4062,3061
PHI_2: J1.T2 J2.T2 J36.1 U1.3 | length 5276
  Top Layer w8: v2(752,3135) 1075,3135 1216.5,3276.5 U1.3
  Top Layer w30: J1.T2@237.22,3133.5 238.47,3134.75 v2@752,3134.75 ; v2(4062,3217) 4183,3217 4266.5,3133.5 J2.T2
  Bottom Layer w30: v2@753.25,3136.25 v2@755,3138 ; v2@755.25,3138.25 v2@755,3138 ; v2(4062,3217) 3721,3217 3642,3138 v2@755,3138
PHI_12: J1.T4 J2.T4 J32.1 U1.7 | length 5280.1
  Top Layer w8: v2(752,2823) 1040,2823 1293.5,3076.5 U1.7
  Top Layer w30: J1.T4@279,2823 v2(752,2823) ; v2(4062,2905) 4183,2905 4266.5,2821.5 J2.T4
  Bottom Layer w30: v2@753.25,2824.25 v2@755,2826 ; v2@755.25,2826.25 v2@755,2826 ; v2(4062,2905) 3722,2905 3643,2826 v2@755,2826
PHI_21: J1.T1 J2.T1 J38.1 U1.9 | length 4819.5
  Top Layer w8: U1.9 1724.54,3026 1800,3026 1903,3129 v2(1903,3294)
  Top Layer w30: J1.T1@237.22,3289.5 239.47,3291.75 v2@752,3291.75 ; v2@4058,3375 4186,3375 4271.5,3289.5 J2.T1
  Bottom Layer w30: v2@752,3294 v2(1903,3294) 3558,3294 3585,3321 3869,3321 3923,3375 v2@4058,3375
  other v2: 752,3291 4062,3373
PWO: J1.B10 J2.B10 J21.1 P1.7 | length 6976.4
  Top Layer w8: P1.7 3118,3573 3241,3450 3702,3450 3811,3341 3811,2038 3958.82,1890.18 J21.1
  Bottom Layer w30: J1.B10@237.22,1885.5 648.5,1885.5 717.18,1816.82 3802,1816.82 3870.81,1885.63 4150,1885.63 J2.B10@4599.88,1885.63
SPKR: J1.B1 J2.B1 J3.1 | length 4382.6
  Bottom Layer w30: J1.B1 654.5,3290 727,3217.5 ; 727,3217.25 3553.25,3217.25 3605,3269 3918.53,3269 3940.53,3291 J3.1@3950,3291 ; J3.1@3950,3289.5 J2.B1
T16: J1.T16 J2.T16 J8.1 | length 4391.1
  Top Layer w30: J1.T16 v2@751,950 ; v2(4062,1033) 4183,1033 4266.5,949.5 J2.T16
  Bottom Layer w30: v2@752,954 v2@755,954 ; v2@753.25,952.25 v2@755,954 ; v2@755.25,954.25 v2@755,954 ; v2(4062,1033) 3725,1033 3646,954 v2@755,954
  other v2: 752,951
TTL_PHI_1: P1.2 P3.1 U1.2 | length 3133.4
  Top Layer w8: U1.2 1411.5,3326.5 1399,3314 1270,3314 1242,3342 1242,3498 1366,3622 2702.5,3622 P1.2 2896.5,3816 3259,3816 3437.5,3637.5 P3.1
TTL_PHI_2: P1.1 U1.4 | length 1585.7
  Top Layer w8: U1.4 1585.5,3226.5 1605,3246 1605,3479 1723,3597 2777.5,3597 P1.1
TTL_PHI_12: P1.4 U1.6 | length 1856.7
  Top Layer w8: U1.6 1591.5,3126.5 1626,3161 1626,3464 1740,3578 2839,3578 2869,3608 2869,3688.5 P1.4
TTL_PHI_21: P1.3 U1.10 | length 1937.6
  Top Layer w8: U1.10 1661.5,3076.5 1646,3061 1646,2993 1655,2984 1812,2984 1954,3126 1954,3489 2021,3556 2881,3556 2918,3593 P1.3
pads on no net: P3.7 P3.8 U1.12 U1.13 U1.15 U1.16

## Polygon pours and split planes (outlines as drawn)
GND on GND "GND_L03_P001" (solid, pour order 1): 572,3675 2725,3675 2725,3875 4400,3875 4400,75 2775,75 2775,275 572,275
+5V on VCC "+5V_L02_P000" (solid, pour order 0): 563,3500 563,425 4225,425 4225,3500
GND on Top Layer "GND_L01_P002" (solid, remove dead copper, pour order 2): 568,3675 2725,3675 2725,3875 4350,3875 4350,75 2775,75 2775,275 568,275

## Keep-outs
Keep-Out Layer:
  the board outline again, w6

## Silkscreen, mask and mechanical layers (free items; w line width, h text height)
Top Overlay:
  lines w6: 896.25,859.75 1159.25,859.75 ; 896.25,1959.75 1100.25,1959.75 ; 896.25,2119.75 1016.25,2119.75 ; 896.25,2259.75 1076.25,2259.75 ; 896.25,2419.75 1083.25,2419.75 ; 896.25,2580.75 1127.62,2580.75 ; 3329.06,2548.37 3560.43,2548.37 ; 3356.43,1922.82 3560.43,1922.82 ; 3380.43,2236.27 3560.43,2236.27 ; 3530.21,2404.47 3717.21,2404.47 ; 3534.21,2088.9 3654.21,2088.9 ; 3535.21,837.24 3798.21,837.24 ; 3877.07,678.69 4068.1,678.69 ; 4047,2391.5 4278,2391.5
  lines w10: 3688,2051 3821,2051 3897,2127 4011,2127 ; 3691,2828 3715,2828 3791,2904 4007,2904 ; 3694,3144 3718,3144 3794,3220 4010,3220 ; 3701,960 3725,960 3801,1036 4002,1036 ; 3704,646 3728,646 3804,722 4006,722 ; 3704,1891 3728,1891 3804,1967 4008,1967 ; 3704,2206 3728,2206 3804,2282 4009,2282 ; 3705,2512 3732,2512 3816,2596 4011,2596 ; 3707,1272 3731,1272 3807,1348 4012,1348 ; 3707,1584 3731,1584 3807,1660 4013,1660 ; 3717,1115 3806,1115 3882,1191 4010,1191 ; 3722,1742 3898,1740 ; 3724,1427 3798,1427 3874,1503 4011,1503 ; 3736,2363 3816,2363 3892,2439 4013,2439 ; 3751,2675 3819,2675 3895,2751 4009,2751 ; 3779,2987 3834,2987 3910,3063 4009,3063 ; 3806,803 3830,803 3906,879 4009,879 ; 3806,3299 3826,3299 3902,3375 4014,3375
  text "GND" at 4383,3792 h50
  text "GND" at 4383,3568 h50
  text "Phi_21" at 893.25,3285.91 h100
  text "SPKR" at 4018,3271 h100
  text "Phi_21" at 3531,3270 h100
  text "Phi_2" at 893.25,3125.91 h100
  text "NC_2" at 3854,3107 h100
  text "Phi_2" at 3346.24,3105 h100
  text "Clock Level / Shifter / CD4050BDR" at 1864.72,3091.03 h40
  text "This end plugs into the backplane" at 1278.18,3000 h150 r270
  text "Phi_1" at 893.25,2965.91 h100
  text "NC_1" at 4018,2963 h100
  text "Phi_1" at 3547,2960 h100
  text "Phi_12" at 893.25,2825.91 h100
  text "Phi_12" at 3296.48,2795 h100
  text "GND" at 3881.84,2790 h100
  text "P1" at 2180,2725 h100
  text "P3" at 2835,2720 h100
  text "+12V" at 893.25,2665.91 h100
  text "+12V" at 3528,2648 h100
  text "GND" at 4018,2648 h100
  text "LMAX" at 893.25,2505.91 h100
  text "GND" at 3881.84,2486 h100
  text "LMAX" at 3327,2472 h100
  text "IRLX" at 893.25,2345.91 h100
  text "IRLX" at 3532.21,2330.63 h100
  text "HALTX" at 4022,2321 h100
  text "RDX" at 893.25,2185.91 h100
  text "-5V" at 3935.4,2167 h100
  text "RDX" at 3382.31,2162.44 h100
  text "RC" at 893.25,2045.91 h100
  text "-12V" at 4021,2016 h100
  text "RC" at 3536.21,2015.07 h100
  text "1  TTL PHI 2 / 2  TTL PHI 1 / 3  TTL PHI 21 / 4  TTL PHI 12 / 5  PRIHX / 6  PRIL / 7  PWO / 8  IRLX / 9  GND / 10 GND" at 2045,1975 h40
  text "1  TTL PHI 1 / 2  LMAX / 3  WRX / 4  RC / 5  RDX / 6  HALTX / 7  N/C / 8  N/C / 9  GND / 10 GND" at 2700,1975 h40
  text "WRX" at 893.25,1885.91 h100
  text "PWO" at 3868.34,1854 h100
  text "WRX" at 3356.41,1848.98 h100
  text "P2 Data Bus" at 2130,1730 h100
  text "+5V" at 893.25,1725.91 h100
  text "+5V" at 4018,1709 h100
  text "+5V" at 3547,1708 h100
  text "B4X" at 893.25,1565.91 h100
  text "B0X" at 3909.22,1544 h100
  text "B4X" at 3401.56,1541 h100
  text "B5X" at 893.25,1425.91 h100
  text "B1X" at 4018,1398 h100
  text "B5X" at 3552,1394 h100
  text "B6X" at 893.25,1265.91 h100
  text "B2X" at 3909.22,1236 h100
  text "B6X" at 3401.56,1228 h100
  text "B7X" at 893.25,1105.91 h100
  text "B7X" at 3539,1083 h100
  text "B3X" at 4018,1083 h100
  text "T16" at 893.25,945.91 h100
  text "+6V" at 3915.05,922 h100
  text "T16" at 3415.43,920 h100
  text "PRIHX" at 893.25,785.91 h100
  text "B17orIF" at 4016,770 h80
  text "PRIHX" at 3537.21,763.4 h100
  text "1  Bit 0 / 2  Bit 4 / 3  Bit 1 / 4  Bit 5 / 5  Bit 2 / 6  Bit 6 / 7  Bit 3 / 8  Bit 7 / 9  GND / 10 GND / Sorry, this may seem / illogical, but see / the schematic" at 2292,689 h40
  text "DIS" at 893.25,625.91 h100
  text "DIS" at 3425.98,610 h100
  text "PRIL" at 3882.31,603.62 h100
  text "GND" at 711,328 h50
  text "Fliptronics(C)  2026_10_10 /    Series 80 I/O Extender" at 1046,305 h120
  text "GND" at 4332,226 h50
Bottom Overlay:
  lines w6: 839.02,613.71 1030.05,613.71 ; 839.02,2329.42 1123.61,2329.44
  lines w30: 576.25,638.25 641.25,638.25 711.25,568.25 806.25,568.25 ; 576.25,794.25 641.25,794.25 711.25,724.25 806.25,724.25 ; 576.25,950.25 641.25,950.25 711.25,880.25 806.25,880.25 ; 576.25,1106.25 641.25,1106.25 711.25,1036.25 806.25,1036.25 ; 576.25,1262.25 641.25,1262.25 711.25,1192.25 806.25,1192.25 ; 576.25,1418.25 641.25,1418.25 711.25,1348.25 806.25,1348.25 ; 576.25,1574.25 641.25,1574.25 711.25,1504.25 806.25,1504.25 ; 576.25,1730.25 641.25,1730.25 711.25,1660.25 806.25,1660.25 ; 576.25,1886.25 641.25,1886.25 711.25,1816.25 806.25,1816.25 ; 576.25,2042.25 641.25,2042.25 711.25,1972.25 806.25,1972.25 ; 576.25,2198.25 641.25,2198.25 711.25,2128.25 806.25,2128.25 ; 576.25,2354.25 641.25,2354.25 711.25,2284.25 806.25,2284.25 ; 576.25,2510.25 641.25,2510.25 711.25,2440.25 806.25,2440.25 ; 576.25,2666.25 641.25,2666.25 711.25,2596.25 806.25,2596.25 ; 576.25,2822.25 641.25,2822.25 711.25,2752.25 806.25,2752.25 ; 576.25,2978.25 641.25,2978.25 711.25,2908.25 806.25,2908.25 ; 576.25,3134.25 641.25,3134.25 711.25,3064.25 806.25,3064.25 ; 576.25,3290.25 641.25,3290.25 711.25,3220.25 806.25,3220.25
  text "SPKR" at 1074.21,3185.53 h100
  text "NC_2" at 1053.12,3031.53 h100
  text "NC_1" at 1041.37,2873.53 h100
  text "GND" at 1025.27,2720.53 h100
  text "GND" at 1025.27,2562.53 h100
  text "GND" at 1025.27,2405.53 h100
  text "HALTX" at 1116.48,2251.53 h100
  text "-5V" at 971.72,2092.53 h100
  text "-12V" at 1021.48,1939.53 h100
  text "PWO" at 1038.78,1785.53 h100
  text "+5V" at 992.07,1624.33 h100
  text "B0X" at 997.89,1469.53 h100
  text "B1X" at 997.89,1313.53 h100
  text "B2X" at 997.89,1157.53 h100
  text "B3X" at 997.89,1001.53 h100
  text "+6V" at 992.07,847.53 h100
  text "B17 or IF" at 1193.44,694.28 h100
  text "PRIL" at 1024.81,538.63 h100
Mechanical 1:
  circle w6: c2600,3787 r72.5
  circle w6: c2600,150 r72.5
  circle w6: c1100,150 r72.5
  circle w6: c1100,3787 r72.5
Board:
  lines w7.87: 0,507.87 413.39,507.87 413.39,0 4901.57,0 4901.57,3937.01 413.39,3937.01 413.39,3429.13 0,3429.13 0,507.87

## Dimensions
1100,3787 to 1422,4042 on Mechanical 1
1100,3787 to 0,3503 on Mechanical 1
2600,3787 to 0,3503 on Mechanical 1
4900,3937.01 to 0,3503 on Mechanical 1
412,3936.5 to 413.39,3429.13 on Mechanical 1
0,507.87 to 413.39,0 on Mechanical 1
403,3936.5 to 413.39,0 on Mechanical 1

## Text inside footprints (layer, text, board x,y; h text height)
P1: Top Overlay "10" at 3178,3807.5 h50; Top Overlay "9" at 3208,3509.5 h50; Top Overlay "1" at 2808,3517.5 h50; Top Overlay "2" at 2798,3807.5 h50
P2: Top Overlay "10" at 3960,357.5 h50; Top Overlay "9" at 3990,59.5 h50; Top Overlay "1" at 3590,67.5 h50; Top Overlay "2" at 3580,357.5 h50
P3: Top Overlay "10" at 4060,3807.5 h50; Top Overlay "9" at 4090,3509.5 h50; Top Overlay "1" at 3690,3517.5 h50; Top Overlay "2" at 3680,3807.5 h50